# Altium PCB EEM_FMC_Carrier.PcbDoc (part 17 of 19)
Units mm, origin at the board's own origin, x right, y up, seen from the top; angles counter-clockwise.
Board outline 222.9 x 100 mm, 6 copper layers (TopLayer, MidLayer1, MidLayer2, SignalLayer1, Internal Plane 1, BottomLayer), stack 1.528 mm thick; 790 components, 743 nets, 3570 pads, 2277 vias.
Unrouted connection lines stored in the file: 3.
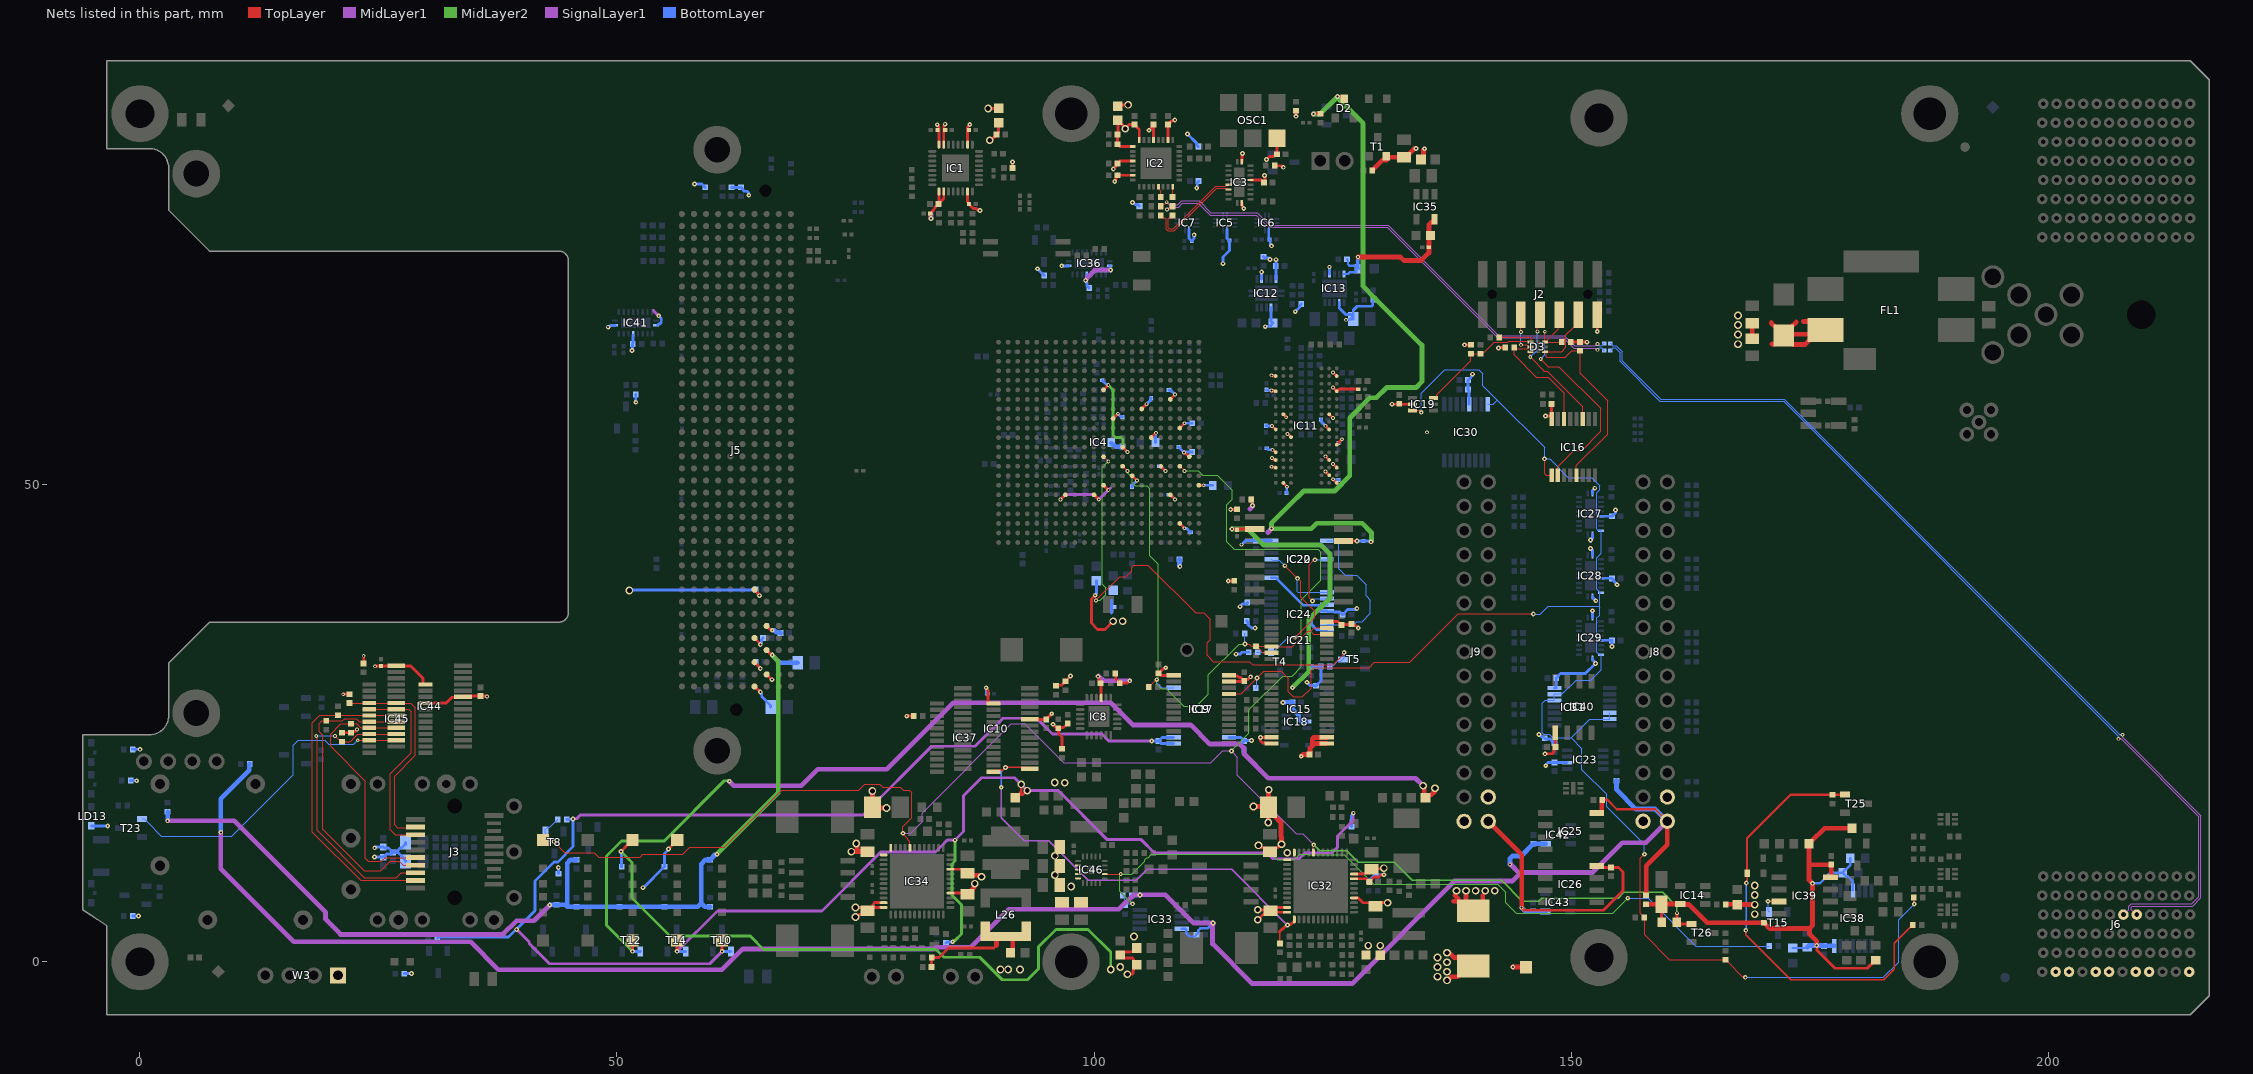
[diagram p19: the nets of this part, all layers, seen from the top]

## Via types
v1: diameter 0.4, hole 0.2, TopLayer to BottomLayer, tented both sides, 1032 vias
v2: diameter 0.5, hole 0.2, TopLayer to BottomLayer, tented both sides, 979 vias
v3: diameter 0.5, hole 0.2, TopLayer to BottomLayer, 162 vias
v4: diameter 0.8, hole 0.5, TopLayer to BottomLayer, tented both sides, 102 vias
v5: diameter 0.6, hole 0.3, TopLayer to BottomLayer, tented both sides, 2 vias

## Nets (pads, with @x,y where several pads share a name; then routed paths per layer and width w, separated by ;. In a path a pad name is that pad's centre, name@x,y a point inside that pad or via, vN(x,y) a via of type N, cw(c..) or ccw(c..) an arc to the next point about the centre after c; other vN are vias at no path point) (continued)
P1V5: C44.2 C80.2 C81.2 C82.2 C83.2 C84.2 C85.2 C86.2 C87.2 C91.2 C101.2 C135.2 C136.2 C137.2 C138.2 C139.2 C140.2 IC4.G19 IC4.H16 IC4.J13 IC4.K20 IC4.L17 IC4.N21 IC11.A1 IC11.A8 IC11.B2 IC11.C1 IC11.C9 IC11.D2 IC11.D9 IC11.E9 IC11.F1 IC11.G7 IC11.H2 IC11.H9 IC11.K2 IC11.K8 IC11.N1 IC11.N9 IC11.R1 IC11.R9 IC12.2 IC13.2 IC13.7 L22.2 R71.1 R74.2 T12.1 TP6.1 | length 150.6
  TopLayer w0.3: v2(51.625,1.1) TP6.1@51.625,2.25 ; IC4.J13@101.998,56.95 v1(102.498,57.45) ; IC4.H16@104.998,57.95 v1(105.498,58.45) ; IC4.L17@105.998,54.95 v1(106.498,55.45) ; IC4.G19@107.998,58.95 v1(108.498,59.45) ; IC4.K20@108.998,55.95 v1(109.498,56.45) ; v1(109.436,53.388) 109.455,53.369 109.525,53.369 109.944,52.95 IC4.N21@109.998,52.95 ; v1(118.591,59.887) 118.618,59.887 118.686,59.819 119.029,59.819 IC11.N9@119.048,59.8 ; v1(118.598,61.475) 118.625,61.475 118.693,61.407 119.041,61.407 IC11.R9@119.048,61.4 ; v1(118.618,51.892) 118.637,51.873 118.912,51.873 IC11.C9@118.985,51.8 ; v1(118.643,56.159) 118.666,56.159 119.025,55.8 IC11.H9@119.048,55.8 ; v1(118.669,52.807) 118.696,52.807 118.883,52.619 119.029,52.619 IC11.D9@119.048,52.6 ; v1(118.694,53.669) 118.721,53.669 118.822,53.569 118.852,53.569 119.021,53.4 IC11.E9@119.041,53.4 ; IC11.A8@119.848,50.2 119.848,50.175 v1(120.223,49.8) ; IC11.K8@119.848,57.4 119.848,57.388 120.146,57.09 v1(120.146,57.077) ; v1(120.294,55.325) 120.309,55.325 120.634,55 IC11.G7@120.648,55 ; v1(124.251,51.385) 124.263,51.385 IC11.B2@124.648,51 ; v1(124.251,56.185) 124.263,56.185 IC11.H2@124.648,55.8 ; v1(124.258,52.985) 124.26,52.985 IC11.D2@124.646,52.6 ; IC11.K2@124.648,57.4 v1(125.048,57) ; v1(125.051,50.585) 125.063,50.585 IC11.A1@125.448,50.2 ; v1(125.051,52.185) 125.063,52.185 IC11.C1@125.448,51.8 ; v1(125.051,60.185) 125.437,59.8 IC11.N1@125.448,59.8 ; v1(125.051,61.785) 125.437,61.4 IC11.R1@125.448,61.4 ; IC11.F1@125.448,54.2 125.448,54.225 v1(125.998,54.775) ; IC11.N1@125.448,59.8 125.674,60.025 C84.2@127.698,60.025
  TopLayer w0.5: v4@134.498,18.369 134.612,18.255 L22.2@134.612,17.45 ; L22.2@134.612,17.45 134.998,17.45 134.998,17.323 134.874,17.2 L22.2@134.748,17.2 ; L22.2@134.998,17.45 135.305,17.45 135.691,17.835 135.691,18.143 v4(135.748,18.2)
  MidLayer2 w0.3: v2(51.625,1.1) 48.9,3.825 48.9,11.1 50.475,12.675 54.95,12.675 61.25,18.975 61.725,18.975 61.773,18.927 v2(61.778,18.927)
  SignalLayer1 w0.5: v2(61.778,18.927) 62.254,18.45 69.323,18.45 71.048,20.175 78.273,20.175 85.248,27.15 101.738,27.15 104.063,24.825 110.133,24.825 112.133,22.825 114.808,22.825 114.809,22.826 115.297,22.826 115.723,22.4 115.723,21.8 118.273,19.25 133.698,19.25 v4(134.498,18.45)
  BottomLayer w0.3: v2(51.625,1.1) T12.1@52.45,1.1 ; v1(102.498,57.45) 102.773,57.175 102.948,57.175 102.998,57.125 C138.2@102.998,57.1 ; v1(105.498,58.45) 105.948,58.9 105.948,59.05 C139.2@105.998,59.1 ; C101.2@106.448,54.45 106.448,55.373 v1@106.498,55.423 ; C137.2@107.848,59.95 107.898,59.9 108.048,59.9 v1(108.498,59.45) ; C140.2@108.848,53.95 108.873,53.95 109.435,53.388 v1(109.436,53.388) ; v1@109.498,53.45 C136.2@110.298,53.45 ; v1(109.498,56.45) C135.2@110.298,56.45 ; v2(117.948,66.575) 118.002,66.575 118.052,66.625 118.423,66.625 C91.2@118.748,66.95 118.57,67.128 IC12.2@118.57,68.573 ; C81.2@118.023,56.2 118.044,56.179 118.624,56.179 v1(118.643,56.159) ; C80.2@118.073,59.95 118.117,59.906 118.572,59.906 v1(118.591,59.887) ; C86.2@118.098,53.825 118.123,53.825 118.279,53.669 v1@118.667,53.669 ; C82.2@120.173,49.125 120.204,49.156 120.204,49.781 v1(120.223,49.8) ; v2(121.098,68.15) 121.578,68.63 121.578,68.81 R71.1@121.718,68.95 ; C87.2@123.798,56.85 123.823,56.85 123.873,56.8 123.873,56.564 v1(124.251,56.185) ; IC13.7@124.7,72.094 v1(124.7,72.819) ; v1@125.078,50.585 125.141,50.523 125.6,50.523 C83.2@125.623,50.5 ; C85.2@125.623,54.375 125.623,54.4 125.673,54.45 125.698,54.45 125.998,54.75 v1(125.998,54.775) ; IC13.2@125.7,69.094 125.7,68.544 126.375,67.869 C44.2@127.125,67.869 ; v1(126.4,67.294) 126.85,67.294 C44.2@127.175,67.619 ; C44.2@127.175,67.394 127.175,68.294 127.6,68.719 129.1,68.719 129.225,68.844 129.225,69.349 R74.2@129.27,69.394
P1V8: C173.2 L3.1 L5.1 L28.2 R200.2 R228.2 T14.1 TP8.1 | length 115.1
  TopLayer w0.3: v2(56.3,1.1) 56.3,2.238 TP8.1@56.312,2.25 ; L28.2@91.698,17.25 L28.2@91.748,17.2 L28.2@92.098,17.55 ; v4@92.371,18.774 92.371,17.823 L28.2@92.098,17.55 ; v4(92.998,17.95) 92.972,17.95 92.572,17.55 L28.2@92.098,17.55 ; v2(100.123,38.425) 99.723,38.025 99.723,35.5 100.373,34.85 101.148,34.85 v4(101.998,35.7)
  MidLayer2 w0.3: v2(85.198,2.104) 85.252,2.104 85.352,2.204 85.402,2.204 86.123,2.925 86.123,5.975 85.123,6.975 85.123,10.25 85.425,10.552 v2(85.425,12.754)
  SignalLayer1 w0.3: v2(56.3,1.1) 60.525,5.325 71.473,5.325 77.648,11.5 83.373,11.5 83.948,12.075 83.948,12.077 84.625,12.754 v2(85.425,12.754) 86.323,13.652 86.323,17.4 88.223,19.3 91.67,19.3 v4(92.371,18.599) v4@93.009,17.961 ; v4(92.998,17.95) 96.248,17.95 101.395,12.803 104.947,12.803 106.35,11.4 118.2,11.4 118.793,10.807 121.082,10.807 121.101,10.826 121.526,10.826 122.1,11.4 124.925,11.4 125.525,12 125.525,13.175 127.179,14.829 v2(127.179,15.581)
  BottomLayer w0.3: v2(56.3,1.1) T14.1@57.2,1.1 ; R228.2@84.498,1.98 84.584,2.066 85.16,2.066 v2(85.198,2.104) ; v2(100.123,38.425) 100.123,38.479 100.248,38.604 L3.1@100.248,39.95 ; 101.848,36.55 101.848,37.9 ; R200.2@126.998,14.17 126.998,15.346 127.179,15.527 v2(127.179,15.581)
  other v4: 102.998,35.7
P2V5: C67.2 C74.2 C76.2 C102.2 C153.2 C175.2 C177.2 C178.2 C182.2 C183.2 C185.2 C187.2 C189.2 C190.2 C191.2 C251.2 C257.2 C288.2 C289.2 D2.3 IC4.F12 IC4.M14 IC4.P18 IC4.R15 IC4.T12 IC4.T22 IC4.U8 IC4.U11 IC4.U19 IC4.Y20 IC8.21 IC9.1 IC17.1 IC17.2 IC20.14 IC21.14 IC22.14 IC23.2 IC24.12 IC24.15 IC32.8 L20.2 R28.2 R29.2 R34.2 R35.2 R78.2 R81.2 R82.2 R98.2 R99.2 R100.2 R102.2 R103.2 R106.2 R108.2 R112.2 R113.2 R208.2 R213.2 T10.1 TP4.1 | length 275
  TopLayer w0.3: TP4.1@61,2.25 61.025,2.225 v2(61.025,1.1) ; v1(96.498,48.45) IC4.U8@96.998,48.95 ; IC4.U11@99.998,48.95 v1(100.498,48.45) ; v2(100.423,29.925) 100.423,29.871 100.538,29.756 100.538,29.36 C74.2@100.698,29.2 C74.2@100.748,29.15 ; IC8.21@100.748,27.65 C74.2@100.748,29.15 ; C74.2@100.758,29.14 C74.2@100.748,29.15 ; IC4.T12@100.998,49.95 v1(101.498,49.45) ; IC4.F12@100.998,59.95 v1(101.498,60.45) ; R29.2@102.218,30.2 102.286,30.132 102.286,29.632 102.558,29.36 102.578,29.36 102.718,29.22 R28.2@102.718,29.2 103.472,29.2 103.722,29.45 v2(103.748,29.45) ; IC4.M14@102.998,53.95 v1(103.498,53.45) ; IC4.R15@103.998,50.95 v1(104.498,50.45) ; IC4.P18@106.998,51.95 107.496,51.452 v1(107.502,51.452) ; v2(107.523,30.825) 107.485,30.787 107.343,30.787 107.157,30.601 107.099,30.601 C76.2@106.748,30.25 106.973,30.025 IC9.1@108.348,30.025 ; IC4.U19@107.998,48.95 v1(108.498,48.45) ; IC4.Y20@108.998,45.95 v1(109.498,45.45) ; IC4.T22@110.998,49.95 v1(111.498,49.95) ; v2(114.073,39.925) 114.076,39.923 114.696,39.923 R100.2@114.698,39.92 ; v2(114.328,47.42) R99.2@114.998,47.42 ; R35.2@116.468,48.45 116.573,48.345 116.573,47.863 v2(116.611,47.825) ; v2(122.998,88.875) 123.013,88.89 R34.2@123.748,88.89 ; IC21.14@124.408,35.66 125.568,35.66 125.765,35.463 125.765,35.443 125.838,35.37 127.028,35.37 127.158,35.24 127.424,35.24 v2@127.664,35 ; v2(125.523,90.7) 126.148,90.7 D2.3@126.248,90.6 ; IC22.14@126.148,44.105 v2(127.568,44.105) ; IC32.8@127.248,8.7 128.548,8.7 128.548,8.675 C257.2@128.823,8.4 ; C257.2@128.948,8.525 128.99,8.525 129.364,8.899 129.885,8.899 130.073,9.087 130.36,9.087 v2(130.398,9.125)
  TopLayer w0.5: C251.2@128.523,0.675 C251.2@128.548,0.7 ; L20.2@129.967,0.669 L20.2@129.998,0.7
  MidLayer1 w0.3: v1(96.498,48.45) 97.023,48.975 99.973,48.975 v1(100.498,48.45) v1(101.498,49.45) 101.727,49.679
  MidLayer1 w0.5: 116.348,47.45 116.611,47.713 v2(116.611,47.825) ; 118.25,45 118.25,45.052 v2(118.598,45.4)
  MidLayer2 w0.3: v1(101.498,60.45) 101.998,59.95 101.998,55.202 102.256,54.944 102.881,54.944 103.025,54.8 ; 103.023,54.8 103.023,53.925 v1(103.498,53.45)
  MidLayer2 w0.5: v2(122.998,88.875) 123.698,88.875 v2(125.523,90.7) 125.523,90.575 128.197,87.901 128.197,77.75 128.197,70.828 129.448,69.577 134.373,64.652 134.373,60.814 133.759,60.2 130.675,60.2 129.6,59.125 128.923,59.125 126.8,57.002 126.8,50.925 125.225,49.35 121.975,49.35 120.475,47.85 118.598,45.973 v2(118.598,45.4) 122.773,45.4 123.349,45.976 128.099,45.976 129.075,45 129.075,44.075 v2(129.025,44.025)
  SignalLayer1 w0.3: v2(39.484,3.391) 40.8,2.075 40.8,1.927 42.927,-0.2 59.725,-0.2 v2(61.025,1.1) ; v2(45.387,14.977) 45.411,15 45.775,15 46.15,15.375 75.773,15.375 82.986,22.588 87.514,22.588 90.45,25.525 93.998,25.525 95.648,23.875 100.823,23.875 101.548,23.15 v2(106.048,23.15)
  SignalLayer1 w0.5: v2@100.498,29.95 100.998,29.45 v2(103.748,29.45)
  BottomLayer w0.3: R78.2@31.17,2.475 31.295,2.6 38.639,2.6 39.43,3.391 v2(39.484,3.391) 39.484,3.445 41.4,5.361 41.4,8.475 43.4,10.475 43.8,10.475 45.4,12.075 45.4,14.964 v2(45.387,14.977) 45.362,14.951 44.771,14.951 R213.2@44.745,14.925 ; v2(61.025,1.1) T10.1@61.95,1.1 ; C102.2@100.873,60.95 100.923,60.9 100.923,60.875 101.298,60.5 101.421,60.5 101.471,60.45 v1(101.498,60.45) ; C178.2@102.998,54 103.158,53.84 103.158,53.79 v1(103.498,53.45) ; C288.2@103.998,49.8 104.048,49.85 104.048,50 v1(104.498,50.45) ; v2(106.048,23.15) C67.2@106.748,23.15 ; C183.2@106.848,51.95 106.898,51.9 107.048,51.9 107.496,51.452 v1(107.502,51.452) ; C289.2@107.848,48.95 107.898,48.9 108.048,48.9 v1(108.498,48.45) ; IC17.1@108.348,22.875 107.023,22.875 C67.2@106.748,23.15 ; IC17.2@108.348,23.525 107.123,23.525 C67.2@106.748,23.15 ; v1(109.498,45.45) 109.517,45.431 109.717,45.431 110.123,45.025 C182.2@110.148,45.025 ; v1(111.498,49.95) C175.2@112.448,49.95 ; v2(114.875,32.25) 115.325,32.25 115.525,32.45 R113.2@116.23,32.45 ; v2(115.302,37.228) 115.302,37.252 115.586,37.535 115.968,37.535 R106.2@116.108,37.675 ; v1(115.473,43.725) 115.898,44.15 C191.2@116.998,44.15 IC20.14@118.598,44.15 ; R112.2@116.005,35.725 116.145,35.585 116.145,35.329 116.498,34.976 116.888,34.976 v2(116.895,34.983) ; v2(122.323,29.3) 122.664,28.959 123.209,28.959 R81.2@123.248,28.92 123.268,28.92 123.408,29.06 123.408,29.08 123.778,29.45 R82.2@123.778,30.95 ; R108.2@122.748,30.92 R82.2@123.748,30.92 ; IC24.15@124.436,34.825 123.325,34.825 122.825,35.325 122.825,36.15 123.444,36.769 124.43,36.769 IC24.12@124.436,36.775 124.511,36.7 125.149,36.7 125.199,36.65 125.8,36.65 C190.2@125.975,36.475 ; C190.2@126.075,36.375 126.426,36.726 126.426,36.784 126.566,36.924 127.395,36.924 127.496,37.025 v2(127.55,37.025) ; v2@127.573,44.1 C189.2@128.248,44.1 128.896,44.1 128.971,44.025 v2(129.025,44.025) ; R208.2@128.778,8.45 128.778,8.47 128.918,8.61 128.938,8.61 129.453,9.125 v2(130.398,9.125) ; v2(146.641,23.82) 146.665,23.82 146.926,23.56 147.108,23.56 147.316,23.352 147.816,23.352 148.088,23.08 148.088,23.06 148.228,22.92 R103.2@148.248,22.92 ; v2(147.35,20.55) 147.388,20.588 147.388,20.67 147.618,20.9 149.573,20.9 IC23.2@149.598,20.875
  BottomLayer w0.45: C153.2@101.798,54.375 101.973,54.2 102.078,54.2 102.274,54.004 102.994,54.004 C178.2@102.998,54
  BottomLayer w0.5: C177.2@108.948,42.2 108.948,41.5 v2(108.998,41.45)
  other v2: 127.7,35
  other v4: 128.748,1.7 129.998,1.7
P3V3: C8.1 C31.2 C39.2 C42.2 C46.2 C47.2 C48.2 C66.2 C75.2 C77.2 C88.2 C111.2 C114.2 C179.2 C180.2 C181.2 C184.2 C188.2 C192.2 C203.2 C221.2 C222.2 C223.2 C224.2 C225.2 C226.2 C278.2 C279.2 C287.2 C298.2 C299.1 C300.2 C323.2 IC3.1 IC3.6 IC3.10 IC5.6 IC6.6 IC7.6 IC9.23 IC9.24 IC10.9 IC12.7 IC12.10 IC15.1 IC15.2 IC15.23 IC15.24 IC16.16 IC17.23 IC17.24 IC18.5 IC19.5 IC22.2 IC27.1 IC27.6 IC27.10 IC28.1 IC28.6 IC28.10 IC29.1 IC29.6 IC29.10 IC30.13 IC31.1 IC36.1 IC36.6 IC36.10 IC37.24 IC40.14 IC41.1 IC41.6 IC41.10 IC44.9 IC44.15 IC45.21 IC45.24 J2.2 J5.d32 L1.1 L2.2 L6.2 L7.2 L26.2 LD13.2 OSC1.6 R18.2 R19.2 R22.2 R30.2 R31.2 R32.2 R33.2 R37.2 R44.2 R70.2 R76.2 R85.2 R86.2 R87.2 R92.2 R121.2 R122.2 R123.2 R178.2 R179.2 R180.2 R207.2 R225.2 R226.2 R230.2 R251.2 R256.2 R278.2 R288.2 TP3.1 W3.1 | length 196.9
  TopLayer w0.3: R180.2@21.175,24.02 21.19,24.005 R278.2@22.125,24.005 22.265,24.145 22.524,24.145 22.729,24.35 v1(22.75,24.35) ; v1(21.3,28.05) 21.327,28.05 21.347,28.07 R179.2@21.975,28.07 ; R288.2@23.425,31.27 23.45,31.295 v1(23.45,32.075) ; v1(24.625,30.975) 24.652,30.975 24.677,31 C114.2@25.275,31 25.3,31.025 IC44.15@26.853,31.025 28.346,31.025 29.651,29.72 29.651,29.15 29.726,29.075 IC45.24@29.925,29.075 ; IC45.21@29.925,27.125 32.1,27.125 32.708,27.733 33.811,27.733 IC44.9@33.853,27.775 33.927,27.85 C323.2@35.7,27.85 35.705,27.845 36.328,27.845 36.348,27.825 v1(36.375,27.825) ; v2(55.39,11.822) 55.39,11.827 TP3.1@56.312,12.75 ; J5.d32@64.418,39.019 64.418,39.005 64.913,38.51 64.913,38.415 v2(64.951,38.377) ; v2(80.375,25.75) 80.388,25.763 81.118,25.763 R37.2@81.13,25.775 ; C279.2@82.948,-0.55 82.948,0.43 R230.2@82.968,0.45 83.748,0.45 84.748,1.45 89.498,1.45 ; v2(88.7,28.725) 88.7,28.671 88.875,28.496 88.875,27.15 88.95,27.075 IC37.24@89.45,27.075 IC37.24@89.4,27.125 ; v4(88.898,89.45) L2.2@89.998,89.45 ; C8.1@91.448,83.2 v2(91.448,83.85) ; IC10.9@93.248,25.425 93.273,25.4 C77.2@94.998,25.4 95.158,25.56 95.158,25.585 v2(95.573,26) ; v2@95.692,24.896 95.968,24.62 96.088,24.62 R33.2@96.088,24.34 ; R31.2@96.023,28.92 96.091,28.988 96.591,28.988 96.863,29.26 96.863,29.28 97.003,29.42 R30.2@97.023,29.42 97.043,29.42 97.183,29.56 97.183,29.58 97.523,29.92 v2(97.523,29.95) ; R19.2@96.65,22.325 96.65,23.55 96.284,23.916 96.284,24.444 R33.2@96.248,24.48 96.316,24.548 96.816,24.548 97.088,24.82 97.088,24.84 97.228,24.98 R32.2@97.248,24.98 ; L1.1@102.498,89.7 102.623,89.825 v4(103.575,89.825) ; IC9.23@114.148,29.375 115.373,29.375 C75.2@115.599,29.601 ; IC9.24@114.148,30.025 114.221,29.952 115.048,29.952 115.199,29.801 115.399,29.801 C75.2@115.599,29.601 ; v2(114.448,45.375) IC22.2@116.848,45.375 ; IC3.1@115.498,79.55 115.498,79.229 115.698,79.029 v2(115.698,78.975) ; IC3.10@115.498,83.85 115.498,84.589 115.577,84.667 v2(115.577,84.721) ; IC3.6@116.398,81.95 117.548,81.95 C39.2@117.798,81.7 117.938,81.84 117.938,82.302 117.876,82.364 v2(117.876,82.418) ; v2(116.425,29.875) 116.414,29.875 116.149,29.61 115.608,29.61 C75.2@115.599,29.601 ; v2(118.089,84.104) 118.412,84.426 118.837,84.426 118.901,84.49 119.013,84.49 C31.2@119.173,84.65 119.188,84.665 OSC1.6@119.188,86.325 ; IC15.24@118.598,22.875 118.523,22.95 117.673,22.95 117.468,23.155 117.468,23.505 v2(117.448,23.525) IC15.23@118.598,23.525 ; R22.2@118.943,83.45 119.619,83.45 119.794,83.275 v2(119.848,83.275) ; v2(121.173,88.625) R256.2@121.173,89.205 ; v2(131.248,58.45) IC19.5@133.398,58.45 ; v2(138.843,64.67) R92.2@139.498,64.67 ; v2(142.398,64.35) 142.398,64.33 142.328,64.4 R87.2@143.103,64.4 ; v2(147.275,21.8) 147.284,21.809 148.042,21.809 148.226,21.993 148.226,22.383 148.343,22.5 IC31.1@148.343,24 ; v2(147.323,57.225) 147.948,57.225 147.948,56.925 IC16.16@147.973,56.9 ; IC16.16@147.948,57.347 C180.2@147.948,58.45 ; R86.2@149.968,64.95 v2(151.673,64.95) ; v2(152.748,66.075) J2.2@152.748,67.825
  TopLayer w0.5: 89.748,1.7 89.791,1.743 89.791,2.45 90.016,2.675 L26.2@90.748,2.675 91.248,2.675 91.473,2.45 91.473,1.175 C278.2@91.248,0.95 ; v2(121.723,21.55) 121.898,21.725 C179.2@122.598,21.725 122.638,21.765 122.638,22.365 122.875,22.602 ; IC15.1@124.398,22.875 123.148,22.875 122.875,22.602 ; IC15.2@124.398,23.525 123.012,23.525 122.875,23.388 122.875,22.602
  MidLayer1 w0.3: 53.85,68.3 53.85,68.235 v2(54.376,67.709)
  MidLayer2 w0.5: v2(114.448,45.375) 116.073,45.375 117.748,43.7 123.748,43.7 124.748,42.7 124.748,38.135 122.498,35.885 122.498,30.423 v2(120.8,28.725)
  SignalLayer1 w0.5: v2(99.123,71.425) 99.247,71.549 99.247,71.639 100.133,72.525 v2(101.748,72.525)
  BottomLayer w0.3: LD13.2@-5.1,14.25 v2(-3.375,14.25) ; R226.2@-0.98,19 -0.968,18.988 -0.363,18.988 v2(-0.35,18.975) ; R44.2@-0.78,22.275 v2(0,22.275) ; R178.2@-0.757,4.8 v2(-0.15,4.8) ; v2(24.575,11) 24.595,10.98 25.48,10.98 C192.2@25.5,10.96 25.505,10.96 25.835,11.29 26.34,11.29 C299.1@26.5,11.45 ; v2(24.6,11.95) 24.654,11.95 24.744,12.04 C42.2@25.5,12.04 25.627,11.913 26.037,11.913 C299.1@26.5,11.45 ; R76.2@27.72,-1.25 27.732,-1.237 28.437,-1.237 v2(28.45,-1.225) ; L6.2@27.85,10.5 27.85,10.65 27.05,11.45 C299.1@26.5,11.45 ; L7.2@27.85,12.5 27.85,12.35 27.425,11.925 27.275,11.925 26.96,11.61 26.66,11.61 C299.1@26.5,11.45 ; v2(43.85,9.9) R207.2@43.85,9.245 R207.2@43.865,9.26 ; v2(49.075,66.525) 49.129,66.525 49.304,66.7 49.775,66.7 IC41.10@49.8,66.725 ; v4(51.298,38.925) 51.348,38.975 64.498,38.975 C203.2@64.548,39.025 64.708,38.865 64.708,38.675 64.958,38.425 v2@64.993,38.425 ; v2(51.575,64.075) 51.613,64.113 51.613,64.738 C300.2@51.65,64.775 51.675,64.8 51.675,65.41 IC41.6@51.675,65.675 ; R18.2@51.945,59.475 51.96,59.46 51.96,58.665 v2(51.975,58.65) ; v2(52.725,7.775) 52.763,7.813 52.823,7.813 54.985,9.975 R225.2@54.985,9.985 ; IC41.1@54.25,66.75 54.361,66.861 54.499,66.861 54.639,67.001 54.639,67.449 v2@54.499,67.589 ; R225.2@55,9.97 R225.2@54.985,9.985 ; v2(55.39,11.822) 55.39,11.768 54.985,11.363 R225.2@54.985,9.985 ; v2(58.123,81.525) 58.898,81.525 59.088,81.335 59.088,81.315 59.228,81.175 R121.2@59.248,81.175 ; R122.2@61.998,81.175 R123.2@62.998,81.175 63.018,81.175 63.147,81.046 63.158,81.035 63.158,80.94 63.334,80.764 63.616,80.764 63.704,80.676 63.774,80.606 ccw(c65.713,80.853) v2(63.822,80.355) ; v2(88.7,28.725) 88.7,28.671 88.75,28.621 88.75,28.15 88.8,28.1 C111.2@88.825,28.1 ; v2(94.073,72.65) 94.613,72.11 94.638,72.11 94.778,71.97 R251.2@94.778,71.95 ; v2(96.623,72.95) IC36.10@97.348,72.95 ; IC36.6@99.248,72.05 99.248,71.604 99.123,71.479 v2(99.123,71.425) 99.161,71.387 99.161,71.245 99.248,71.159 99.248,70.9 C287.2@99.498,70.65 ; IC36.1@101.648,72.95 101.685,72.95 101.71,72.925 101.71,72.563 v2(101.748,72.525) ; IC7.6@109.948,76.75 109.948,75.85 110.173,75.625 110.198,75.625 C48.2@110.248,75.575 ; C48.2@110.248,75.55 C48.2@110.248,75.575 ; v2(110.498,76.2) 110.498,75.801 110.322,75.625 110.298,75.625 C48.2@110.248,75.575 ; v2(113.513,73.177) 113.513,73.889 114.198,74.574 C46.2@114.198,75.6 114.173,75.6 113.948,75.825 IC5.6@113.948,76.75 ; IC17.24@114.148,22.875 115.412,22.875 115.527,22.99 115.588,22.99 C66.2@115.748,23.15 ; IC17.23@114.148,23.525 115.412,23.525 115.588,23.349 115.588,23.31 115.698,23.2 v2(116.498,23.2) ; IC12.7@117.57,71.573 117.57,72.297 v2(117.573,72.3) ; R70.2@117.748,73.92 117.864,73.804 118.257,73.804 v2(118.446,73.615) ; IC6.6@118.323,76.75 118.323,75.75 118.373,75.7 C47.2@118.398,75.7 118.423,75.7 118.473,75.65 118.473,75.229 118.598,75.104 v2(118.598,75.05) ; IC12.10@119.07,71.573 119.07,72.928 C88.2@119.048,72.95 119.06,72.963 119.06,73.587 v2(119.073,73.6) ; IC30.13@139.323,58.45 139.323,59.875 C221.2@139.198,60 C222.2@139.198,61 139.358,61.16 139.397,61.16 139.635,61.397 139.635,61.562 v2(139.673,61.6) ; IC40.14@148.254,28.696 148.375,28.696 148.45,28.771 C298.2@148.45,29.75 ; C298.2@148.45,29.755 148.455,29.755 148.61,29.91 148.61,29.915 148.902,30.208 151.496,30.208 v2(152.556,31.267) 152.518,31.306 152.518,31.405 152.248,31.675 IC29.10@152.248,31.8 ; v2@152.059,43.35 v2(152.034,43.325) 152.073,43.325 152.248,43.15 IC28.1@152.248,42.6 ; v2@152.072,44.051 152.072,44.163 v2(152.034,44.202) 152.072,44.202 152.248,44.377 IC27.10@152.248,44.8 ; IC29.1@152.248,36.1 v2(152.248,36.8) ; IC28.10@152.248,38.3 152.248,38.175 152.298,38.125 152.322,38.125 v2@152.597,37.85 ; IC27.1@152.248,49.1 152.248,49.4 v2(152.498,49.65) ; IC29.6@153.148,33.7 C225.2@154.298,33.7 v2(154.298,33.05) ; IC28.6@153.148,40.2 C223.2@154.298,40.2 154.458,40.04 154.458,39.94 154.826,39.572 v2(154.826,39.525) v2@154.873,39.478 ; IC27.6@153.148,46.7 C224.2@154.298,46.7 154.649,47.051 154.649,47.109 154.673,47.133 v2(154.673,47.35)
  BottomLayer w0.5: v2(119.8,27.175) 119.825,27.2 C181.2@120.798,27.2 120.801,27.197 120.801,26.522 121.473,25.85 121.473,25.443 121.761,25.155 122.243,25.155 IC18.5@122.248,25.15
  other v1: 134.9,55.5
  other v2: 95.692,24.897 152.598,37.85
  other v4: 90.19,-0.8 90.998,-0.8 92.248,-0.8 96.925,18.775 95.875,18.8
P3V3_ADCLK: C32.2 C33.2 C34.2 C35.2 C36.2 C37.2 C38.2 IC1.10 IC1.15 IC1.16 IC1.25 IC1.26 IC1.31 L2.1 | length 16.9
  TopLayer w0.3: v2(82.923,77.9) 82.886,77.938 82.886,78.413 C35.2@82.848,78.45 82.873,78.45 82.923,78.5 82.923,78.525 83.173,78.775 83.173,78.867 83.347,79.041 83.347,79.099 C38.2@83.698,79.45 C38.2@83.748,79.5 ; v2(83.573,87.75) 83.573,87.696 83.748,87.521 IC1.16@83.748,85.65 ; IC1.25@83.748,80.75 C38.2@83.748,79.5 ; IC1.26@84.248,80.75 84.248,80 C38.2@83.748,79.5 ; IC1.15@84.248,85.65 84.248,87.596 84.398,87.746 v2(84.398,87.8) ; IC1.31@86.748,80.75 86.748,79.676 86.823,79.601 86.823,79.5 86.873,79.45 86.923,79.45 86.973,79.4 86.973,79.312 87.336,78.949 87.657,78.949 87.818,78.788 88.01,78.788 v2(88.048,78.75) ; IC1.10@86.748,85.65 86.748,87.499 86.973,87.724 v2(86.973,87.775) ; v4(89.073,86.125) 89.169,86.221 89.319,86.221 C32.2@89.798,86.7 89.998,86.9 L2.1@89.998,87.95
  SignalLayer1 w0.5: v2(82.923,77.9) 82.923,78.324
P3V3_CLK_MUX: C10.1 C16.1 C21.1 C22.2 C23.2 C24.2 C25.2 C26.2 C27.2 C28.2 IC2.10 IC2.13 IC2.16 IC2.17 IC2.20 IC2.23 L1.2 | length 21.5
  TopLayer w0.3: v2(102.026,83.095) 102.026,83.109 102.288,83.371 102.288,83.54 C28.2@102.448,83.7 102.698,83.95 IC2.20@104.048,83.95 ; v2(102.173,81.8) 102.173,81.854 102.288,81.969 102.288,82.29 C24.2@102.448,82.45 IC2.23@104.048,82.45 ; IC2.17@104.048,85.45 102.698,85.45 C23.2@102.448,85.7 C25.2@102.448,86.7 102.498,86.75 L1.2@102.498,88.2 103.273,87.425 v4(103.273,87.325) 103.698,87.75 C26.2@104.248,87.75 104.748,87.25 IC2.16@104.748,86.15 ; v2(105.756,87.164) 105.756,87.183 106.088,87.515 106.088,87.59 C27.2@106.248,87.75 IC2.13@106.248,86.15 ; IC2.10@107.748,86.15 C22.2@107.748,87.75 108.099,88.101 108.157,88.101 108.243,88.187 108.435,88.187 v2(108.473,88.225)
  BottomLayer w0.3: v2(104.048,79.6) 104.102,79.6 104.317,79.385 104.588,79.385 C21.1@104.748,79.225 ; v2(109.798,86.775) 110.763,85.81 110.763,85.635 C16.1@110.923,85.475 ; v2(110.773,81.125) 110.773,81.179 110.824,81.23 110.824,81.676 C10.1@110.973,81.825
P3V3_FMC: C207.2 C208.1 C209.1 C230.2 J5.c39 J5.d36 J5.d38 J5.d40 L9.2 L11.2 R160.2 TP9.1 | length 81.4
  TopLayer w0.3: v2(50.425,11.576) 51.114,12.265 51.14,12.265 51.599,12.724 TP9.1@51.599,12.75 ; J5.d38@64.418,31.399 65.023,30.794 v2(65.023,30.75) ; J5.d36@64.418,33.939 64.985,33.372 64.985,33.296 v2(65.023,33.257) ; J5.d40@64.439,28.859 v2(65.023,28.275) ; J5.c39@65.688,30.129 66.242,29.575 v2(66.248,29.575) ; 103.998,-1.3 104.098,-1.2 104.098,-0.95 104.148,-0.9 104.148,-0.65 L11.2@104.498,-0.3 104.148,0.05 104.148,0.3 104.041,0.407 103.041,0.407 C230.2@102.748,0.7 103.073,1.025 103.724,1.025 103.749,1.05 104.023,1.05 104.073,1.1 104.148,1.1 L9.2@104.498,1.45
  MidLayer2 w0.3: v2(50.425,11.576) 51.575,10.426 51.575,6.675 55.55,2.7 63.973,2.7 65.373,1.3 83.448,1.3 84.272,0.476 88.029,0.476 90.38,-1.875 93.025,-1.875 94.2,-0.7 94.2,1.6 96,3.4 99.375,3.4 101.748,1.027 v4(101.748,-0.8)
  BottomLayer w0.3: v2(50.425,11.576) 50.463,11.538 50.463,10.007 R160.2@50.5,9.97 ; C207.2@64.548,31.45 64.708,31.29 64.708,31.119 v2@65.023,30.804 ; v2(65.023,28.275) 65.023,28.221 65.175,28.069 65.175,27.798 66.098,26.875 C208.1@66.098,26.7 ; v2(65.023,33.257) 65.023,33.312 65.138,33.427 65.138,33.79 C209.1@65.298,33.95
  other v4: 103.498,-1.3 102.748,-0.55 104.198,2.65
P3V3_FMC_ENABLE: IC10.1 IC32.37 IC37.13 R191.2 | length 48.6
  TopLayer w0.15: IC37.13@89.45,19.925 89.597,20.072 90.422,20.072 v2(90.725,20.375) 93.098,20.375 IC10.1@93.248,20.225 ; 119.459,3.12 119.459,1.959 R191.2@119.498,1.92
  TopLayer w0.3: 119.462,3.122 119.462,3.168 119.734,3.44 119.779,3.44 120.089,3.75 120.121,3.75 120.259,3.888 120.588,3.888 120.875,4.175 120.998,4.175 IC32.37@120.998,4.45
  SignalLayer1 w0.15: v2(90.273,18.296) 90.273,15.1 92.687,12.686 95.264,12.686 99.4,8.55 104.45,8.55 105.6,9.7 114.425,9.7 v2(120.275,3.85)
  BottomLayer w0.15: v2(90.273,18.296) 90.273,19.923 v2(90.725,20.375)
P3V3_MP: C219.2 C245.2 C306.2 IC25.8 IC33.8 IC42.4 J8.30 R101.2 R186.2 R187.2 R283.2 | length 221.6
  TopLayer w0.25: IC25.8@152.698,15.605 152.793,15.7 IC25.8@153.053,15.7 ; IC25.8@152.793,15.605 IC25.8@153.003,15.605 ; C219.2@153.275,16.944 153.317,16.986 153.814,16.986 154.8,16 158.825,16 J8.30@160.098,14.727
  TopLayer w0.5: IC25.8@153.003,15.605 153.165,15.605 153.215,15.655 153.215,16.884 C219.2@153.275,16.944 ; R283.2@157.875,6.97 157.875,10.05 160.098,12.273 J8.30@160.098,14.727
  SignalLayer1 w0.5: v2(8.475,13.575) 8.475,9.75 16.125,2.1 34.65,2.1 37.575,-0.825 61,-0.825 63.175,1.35 83.3,1.35 83.478,1.528 87.103,1.528 91.075,5.5 102.609,5.5 104.112,7.003 v2(104.815,7.003) ; v2@104.832,7.02 107.48,7.02 110.439,4.061 v2(112.459,4.061) 112.459,3.901 112.422,3.864 112.422,1.878 116.575,-2.275 127.05,-2.275 137.8,8.475 143.875,8.475 144.644,9.244 ; v1(143.625,10.2) 143.688,10.2 144.644,9.244 ; J8.30@160.098,14.727 157.846,12.475 155.375,12.475 152.276,9.376 144.776,9.376 144.644,9.244
  BottomLayer w0.25: R187.2@103.968,6.93 104.675,6.93 104.747,7.003 v2(104.815,7.003) ; IC33.8@109.198,3.475 109.552,3.475 109.652,3.375 109.652,3.021 110.023,2.65 C245.2@110.548,2.65 ; C245.2@110.733,2.835 110.918,3.02 110.918,3.268 111.152,3.502 111.9,3.502 v2(112.459,4.061)
  BottomLayer w0.5: v2(8.475,13.575) 8.475,17.1 11.46,20.085 11.46,20.71 R186.2@11.5,20.75 ; v1(143.625,10.2) 143.613,10.212 143.613,10.846 143.85,11.083 144.758,11.083 C306.2@146.05,12.375 IC42.4@147.35,12.375 ; R101.2@154.773,19.02 154.773,18.027 156.783,16.017 158.808,16.017 J8.30@160.098,14.727
P3V3_MP2: C220.2 C307.2 IC26.8 IC43.4 J9.30 | length 29.6
  TopLayer w0.3: v1(144.825,5.675) 145.1,5.4 153.4,5.4 155.45,7.45 155.45,9.425 154.975,9.9 IC26.8@152.743,9.9
  TopLayer w0.5: J9.30@141.314,14.714 144.825,11.203 v1(144.825,5.675)
  BottomLayer w0.5: v1(144.825,5.675) 145.2,5.3 C307.2@146.025,5.3 147.3,5.3 IC43.4@147.325,5.275
P3V3_MP_B: C43.1 C155.2 C167.2 IC14.5 IC38.4 IC38.14 IC39.8 R197.1 R260.1 R262.1 R266.1 R267.2 R268.1 R277.2 R279.1 R282.1 R283.1 | length 60.5
  TopLayer w0.3: R277.2@159.5,4.125 159.5,6.028 C43.1@159.524,6.052 ; v2(175.75,1.7) 175.788,1.662 175.788,1.212 177.675,-0.675 181.055,-0.675 181.886,0.155 R279.1@181.936,0.155
  TopLayer w0.5: R283.1@157.875,6.03 C43.1@159.502,6.03 ; C43.1@159.524,6.052 IC14.5@161.448,6.052 ; IC14.5@161.45,6.05 161.5,6 162.4,6 164.295,4.105 170.245,4.105 170.285,4.065 170.285,4.045 170.848,3.482 175,3.482 175,2.893 175.75,2.143 v2(175.75,1.7) ; R268.1@174.835,12.26 174.835,12.305 175.145,12.615 175.19,12.615 176.575,14 R267.2@179.45,14 ; R268.1@174.945,12.365 174.945,10.275 ; 175,3.497 175.3,3.797 v2(175.3,8.225) 174.945,8.58 174.945,10.275 ; IC39.8@177.281,8.805 C155.2@177.281,10.186 175.034,10.186 174.945,10.275
  BottomLayer w0.25: R260.1@173.25,1.45 174.7,1.45 R197.1@174.775,1.525 ; v2(175.3,8.225) 176.075,8.225 177.2,9.35 R282.1@178.5,9.35 178.5,9.3 178.825,8.975 179.001,8.975 179.547,8.429 IC38.4@179.547,7.476 ; R282.1@178.5,9.4 178.825,9.725 178.875,9.725 179.25,10.1 R262.1@179.25,10.85
  BottomLayer w0.5: R197.1@174.775,1.525 174.95,1.7 v2(175.75,1.7) 176.44,1.7 C167.2@176.475,1.665 ; C167.2@176.5,1.675 IC38.14@177.598,1.675
P5V0: C94.2 C202.2 C286.2 IC13.10 IC35.5 R73.2 | length 16.8
  TopLayer w0.5: v1(127.656,73.875) 132.125,73.875 132.475,73.525 134.325,73.525 135.1,74.3 C202.2@135.1,74.902 C286.2@135.1,76.152 ; C286.2@135.25,76.152 C286.2@135.1,76.152 ; IC35.5@135.7,77.852 135.7,77.602 135.65,77.552 135.4,77.552 135.1,77.252 C286.2@135.1,76.152
  BottomLayer w0.254: IC13.10@126.2,72.094 126.625,72.094 126.819,72.288 127.427,72.288 127.475,72.337 C94.2@127.475,72.921 ; R73.2@126.52,73.644 R73.2@126.625,73.539 ; R73.2@126.625,73.38 R73.2@126.625,73.539 ; 127.178,72.969 126.775,72.969 126.625,73.119 R73.2@126.625,73.539 ; 127.178,72.986 C94.2@127.388,72.986 ; C94.2@127.656,72.763 C94.2@127.775,72.644
  BottomLayer w0.35: C94.2@127.656,72.763 v1(127.656,73.875)
P12V0: C40.2 C72.2 C204.1 C205.1 C262.2 C263.2 D10.1 FL1.2 J5.c35 J5.c37 J6.A1 J6.D1 J6.E1 J6.G1 J6.H1 J6.J1 J6.K1 J8.28 J8.29 J9.28 J9.29 L13.1 L29.1 R27.2 R165.2 R166.2 R224.2 R236.2 R237.2 R238.2 R249.2 R250.2 R263.1 T1.3 TP2.1 | length 138.6
  TopLayer w0.3: J5.c37@65.688,32.669 66.169,32.188 66.235,32.188 v2(66.273,32.15) ; J5.c35@65.688,35.209 66.109,34.788 66.235,34.788 v2(66.273,34.75)
  TopLayer w0.5: R27.2@129.188,82.95 129.188,82.97 130.268,84.05 130.648,84.05 130.698,84.1 130.698,84.3 130.723,84.325 132.475,84.325 C72.2@132.5,84.35 132.675,84.35 133.575,85.25 v2(133.75,85.25) ; C72.2@132.675,84.2 C72.2@132.7,84.225 ; L29.1@134.275,84.1 134.525,84.35 134.525,85.1 v2(134.65,85.225) ; 137.688,6.35 138.005,6.35 138.055,6.3 138.298,6.3 139.248,5.35 L13.1@139.748,5.35 ; 137.83,6.968 138.176,6.622 ; 138.998,6.95 138.998,6.1 L13.1@139.748,5.35 ; L13.1@140.248,5.35 L13.1@139.798,5.35 ; 140.748,6.95 140.748,6.3 L13.1@139.798,5.35 ; v2(143.9,-0.55) TP2.1@145.275,-0.55 ; R263.1@166.22,6 166.252,6.032 C40.2@167.431,6.032 ; C40.2@167.449,6 v4(169.25,6) ; C263.2@169,65.325 C262.2@169,66.95 ; 171,67 171,66.942 171.383,66.559 171.458,66.559 172.283,65.734 D10.1@172.283,65.659 ; 171.033,64.759 D10.1@171.458,64.759 ; D10.1@172.41,65.785 FL1.2@174.967,65.785 ; D10.1@173.108,66.559 173.608,67.059 ; D10.1@173.233,64.709 174.533,64.709 175.033,65.209 FL1.2@175.61,65.785 ; 174.358,67.134 174.378,67.114 FL1.2@175.778,67.114 ; FL1.2@174.967,65.853 175.617,65.853 FL1.2@175.549,65.785 ; FL1.2@175.193,65.43 FL1.2@175.549,65.785 ; FL1.2@176.033,66.209 FL1.2@175.61,65.785 ; FL1.2@176.26,65.785 FL1.2@175.61,65.785 ; L13.1@139.748,5.35 L13.1@139.798,5.35 ; FL1.2@175.549,65.785 FL1.2@175.61,65.785
  MidLayer2 w0.5: v2(60.475,11.275) 66.898,17.698 66.898,31.525 v2(66.273,32.15)
  SignalLayer1 w0.5: v2(2.9,14.775) 9.875,14.775 19.45,5.2 19.45,4.45 21.025,2.875 38.05,2.875 39.475,4.3 41.3,4.3 v2(42.95,5.95)
  BottomLayer w0.5: v2(2.9,14.775) R166.2@2.9,15.73 ; v2(42.95,5.95) 42.98,5.98 R250.2@43.675,5.98 44.575,5.98 44.775,5.78 ; R165.2@45.75,10.72 45.71,10.68 45.105,10.68 44.775,10.35 44.775,5.78 ; R249.2@59.75,5.78 59.195,5.78 58.825,6.15 ; R224.2@59.75,10.72 59.71,10.68 59.255,10.68 58.825,10.25 58.825,6.15 ; R224.2@59.77,10.72 60.325,11.275 v2(60.475,11.275) ; v2(66.273,32.15) 67.073,31.35 C204.1@68.923,31.35 ; v2@66.497,34.75 66.712,34.535 67.088,34.535 C205.1@67.148,34.475 ; 44.775,5.78 R237.2@45.75,5.78 R236.2@50.25,5.78 R238.2@55,5.78 58.455,5.78 58.825,6.15
  other v4: 169.25,5 169.25,7 137.998,7.45 138.998,7.45 139.998,7.45 140.998,7.45 141.998,7.45 169.25,8 167.5,64.75 167.5,65.75 167.5,66.75 167.5,67.75
P12V0_SMPS: C61.2 C62.2 C63.2 C68.2 C69.2 C231.1 C232.2 C233.2 C234.2 C235.2 C265.1 C266.2 C267.2 C268.2 C269.2 IC32.4 IC32.9 IC32.24 IC32.25 IC32.35 IC32.36 IC34.4 IC34.9 IC34.24 IC34.25 IC34.35 IC34.36 IC46.2 IC46.3 IC46.4 IC46.5 L13.2 | length 52.2
  TopLayer w0.3: v4(74.998,4.7) 75.133,4.7 75.383,4.95 75.848,4.95 C267.2@76.248,5.35 75.898,5.7 v4(74.998,5.7) ; C267.2@76.498,5.45 76.747,5.699 IC34.36@77.95,5.699 ; C267.2@76.498,5.7 76.773,5.7 76.823,5.75 76.823,6.023 76.999,6.199 IC34.35@77.95,6.199 ; IC34.4@84.95,7.199 86.649,7.199 C269.2@86.748,7.1 ; IC34.9@84.95,9.699 86.349,9.699 C268.2@86.748,9.3 ; v4(117.173,4.4) 117.723,4.95 118.098,4.95 C232.2@118.498,5.35 ; v4(117.173,5.45) 118.398,5.45 C232.2@118.498,5.35 ; v4(117.248,12.2) 117.383,12.2 117.633,11.95 118.098,11.95 118.498,11.55 118.898,11.95 119.222,11.95 119.597,12.325 v4@119.623,12.325 ; IC32.36@120.248,5.2 118.648,5.2 C232.2@118.498,5.35 ; IC32.35@120.248,5.7 118.848,5.7 C232.2@118.498,5.35 ; IC32.4@127.248,6.7 127.694,6.7 128.2,6.193 129.155,6.193 C235.2@129.498,5.85 129.848,6.2 v4(130.773,6.2) ; IC32.9@127.248,9.2 128.247,9.2 128.347,9.3 128.723,9.3 C234.2@129.098,9.675 ; C234.2@129.073,9.7 129.123,9.75 130.331,9.75 130.375,9.794 130.375,9.815 v4(130.385,9.825)
  TopLayer w0.5: v4(74.573,11.55) C266.2@76.248,11.55 C266.2@75.948,11.85 ; v4(75.073,12.4) 75.13,12.343 75.13,12.093 75.18,12.044 75.18,11.696 ; v4(76.773,17.9) 76.773,16.225 C265.1@76.798,16.2 76.873,16.125 v4(78.248,16.125) ; C269.2@86.748,7.1 86.923,7.1 87.223,7.4 87.223,7.575 87.441,7.793 87.441,8.143 v4(87.498,8.2) ; C268.2@86.748,9.3 86.986,9.062 87.977,9.062 88.128,8.911 v4(88.209,8.911) ; v4(116.723,16.275) 116.729,16.269 118.229,16.269 C231.1@118.298,16.2 ; v4(118.273,14.6) 118.273,16.175 C231.1@118.298,16.2 ; v4(118.323,18.025) 118.298,18 C231.1@118.298,16.2 ; v4(119.648,12.325) 119.648,13.068 119.6,13.116 119.6,14.598 118.948,15.25 118.948,15.55 C231.1@118.298,16.2 ; v4@136.946,-2 137.016,-2 137.441,-1.575 138.123,-1.575 L13.2@139.248,-0.45 ; v4(136.998,0.95) 137.055,0.893 137.272,0.893 137.701,0.464 138.334,0.464 L13.2@139.248,-0.45 ; L13.2@139.748,-0.45 L13.2@139.248,-0.45
  other v4: 136.998,-1.949 135.998,-1.55 136.998,-1.05 135.998,-0.55 136.998,-0.05 135.998,0.45 97.6,7.9 95.9,9.1 95.9,11.1 120.251,11.433
PE_CK_N: C13.2 IC2.32 | length 1.1
  TopLayer w0.085: C13.2@108.248,80.15 IC2.32@108.248,81.25
PE_CK_P: C12.2 IC2.29 | length 1.2
  TopLayer w0.085: IC2.29@106.748,81.25 106.855,81.143 106.855,80.943 106.998,80.8 C12.2@106.998,80.15
PE_CLK.CLK_N: C11.1 C13.1 R128.1 | length 53.4
  TopLayer w0.085: v1(107.648,78.85) 107.86,79.062 108.16,79.062 C11.1@108.248,79.15
  SignalLayer1 w0.11: v1(107.648,78.85) 107.648,78.862 107.905,79.119 108.869,79.119 109.275,79.525 110.915,79.525 111.495,78.945 112.164,78.276 117.014,78.276 117.54,77.75 118.315,76.975 129.448,76.975 130.74,76.975 142.302,65.413 149.202,65.413 150.283,64.332 151.316,64.332 152.564,64.332 152.745,64.15 v1(152.773,64.15)
  BottomLayer w0.085: v1(152.773,64.15) 152.778,64.15 152.972,64.344 153.231,64.344 153.281,64.294 153.281,64.243 153.448,64.075 R128.1@153.468,64.075
PE_CLK.CLK_P: C9.1 C12.1 R127.1 | length 53.5
  TopLayer w0.085: C12.1@106.998,79.25 107.136,79.388 107.386,79.388 v1(107.623,79.625)
  SignalLayer1 w0.11: v1(107.623,79.625) 107.635,79.625 107.904,79.356 108.771,79.356 109.177,79.762 111.013,79.762 112.262,78.512 117.113,78.512 117.875,77.75 118.413,77.212 129.448,77.212 130.838,77.212 142.4,65.65 149.3,65.65 150.381,64.569 151.218,64.569 152.564,64.569 152.745,64.75 v1(152.773,64.75)
  BottomLayer w0.085: v1(152.773,64.75) 152.778,64.75 152.972,64.556 153.231,64.556 153.281,64.606 153.281,64.658 153.448,64.825 R127.1@153.468,64.825
PE_CLK_ALT_N: C11.2 IC3.16 | length 9.9
  TopLayer w0.085: C11.2@108.248,78.25 107.994,77.996 107.871,77.996 107.762,77.887 107.762,76.9 107.812,76.85 108.325,76.85 112.781,81.306 113.791,81.306 113.841,81.356 113.841,81.368 113.923,81.45 IC3.16@114.098,81.45
PE_CLK_ALT_P: C9.2 IC3.17 | length 10.3
  TopLayer w0.085: C9.2@106.998,78.25 107.256,77.992 107.433,77.992 107.55,77.875 107.55,76.812 107.724,76.638 108.413,76.638 112.869,81.094 113.791,81.094 113.841,81.044 113.841,81.032 113.923,80.95 IC3.17@114.098,80.95
PE_CLK_N: J6.F4 R128.2 | length 100.1
  SignalLayer1 w0.11: v1(207.376,23.376) 207.395,23.356 207.652,23.356 215.788,15.22 215.788,6.8 215.05,6.062 208.722,6.062 208.482,5.822 208.482,5.475 207.957,4.95 J6.F4@207.9,4.95
  BottomLayer w0.085: R128.2@154.128,64.075 154.148,64.075 154.315,64.243 154.315,64.294 154.365,64.344 154.644,64.344 155.138,63.85 155.138,62.937 159.325,58.75 172.275,58.75 207.28,23.745 ; 207.28,23.745 207.372,23.653 207.372,23.379 v1(207.376,23.376)
PE_CLK_P: J6.E4 R127.2 | length 100.5
  SignalLayer1 w0.11: v1(207.8,23.8) 207.82,23.78 207.82,23.524 216.025,15.318 216.025,6.701 215.149,5.825 208.82,5.825 208.719,5.724 208.719,5.475 209.244,4.95 J6.E4@209.3,4.95
  BottomLayer w0.085: R127.2@154.128,64.825 154.148,64.825 154.315,64.658 154.315,64.606 154.365,64.556 154.732,64.556 155.35,63.938 155.35,63.025 159.413,58.962 172.363,58.962 207.367,23.957 207.522,23.803 207.797,23.803 v1(207.8,23.8)
PGOOD_FMC: IC4.P20 IC32.20 IC34.20 R213.1 R277.1 T8.1 T26.1 TP1.1 | length 201.9
  TopLayer w0.125: TP1.1@42.25,12.75 42.376,12.624 v2(43.375,12.624) 44.549,11.45 47.6,11.45 48.1,10.95 52.412,10.95 52.712,11.25 56.9,11.25 57.65,12 61.248,12 67.248,18 75.323,18 75.948,18.625 77.523,18.625 77.848,18.3 79.691,18.3 79.991,18 80.623,18 80.873,17.75 80.873,15.075 79.973,14.175 v2(79.973,13.475) 80.023,13.475 80.123,13.375 80.123,13.25 80.498,12.875 80.498,12.807 80.7,12.605 IC34.20@80.7,11.949 ; IC4.P20@108.998,51.95 v1(109.498,51.45) ; IC32.20@122.998,11.45 122.998,12.228 v2(123.034,12.264)
  TopLayer w0.3: v1(161.1,5.1) R277.1@161.1,4.125 161.25,3.975 T26.1@162.625,3.975
  MidLayer2 w0.125: v1@109.473,51.45 v1(109.498,51.45) 110.948,51.45 111.398,51 112.898,51 114.473,49.425 114.473,48.5 113.898,47.925 113.898,44.05 114.722,43.226 123.497,43.226 123.773,42.95 123.773,39.975 121.748,37.95 121.748,30.923 120.775,29.95 119.775,29.95 116.223,26.398 116.223,23.974 114.398,22.149 v2(114.398,22.1)
  MidLayer2 w0.15: v2(123.034,12.264) 123.673,11.625 126.5,11.625 127.7,10.425 131.45,10.425 133.35,8.525 142.725,8.525 144.901,6.349 146.599,6.349 146.925,6.675 154.95,6.675 155.55,7.275 159.6,7.275 161.1,5.775 v1(161.1,5.1)
  SignalLayer1 w0.125: v2(79.973,13.475) 80.773,13.475 81.998,14.7 81.998,15.598 91.35,24.95 92.748,24.95 96.848,20.85 112.225,20.85 113.475,22.1 v2(114.398,22.1) 115.034,21.464 115.034,19.566 121.175,13.425 121.873,13.425 v2(123.034,12.264)
  BottomLayer w0.125: v2(43.375,12.624) 43.351,12.624 42.5,13.475 T8.1@42.5,13.675 42.5,13.875 42.737,14.112 42.937,14.112 43.503,14.678 43.578,14.678 43.805,14.905 R213.1@43.805,14.925
PROG_TCK: D3.3 IC16.2 J2.6 R86.1 | length 27.1
  TopLayer w0.125: v1(146.823,63.175) 147.598,62.4 148.725,62.4 153.125,58 153.125,55.6 151.1,53.575 150.298,53.575 148.623,51.9 IC16.2@148.623,51 ; v1(147.256,66.04) 147.258,66.038 D3.3@147.258,64.95 D3.3@147.407,64.95 ; J2.6@148.748,67.825 148.644,67.721 148.644,66.288 147.511,65.155 147.511,65.038 147.423,64.95 D3.3@147.407,64.95 ; R86.1@149.028,64.95 D3.3@147.407,64.95
  BottomLayer w0.125: v1(146.823,63.175) 147.256,63.608 v1(147.256,66.04)
PROG_TDI: D3.5 IC16.14 J2.10 R87.1 | length 16.3
  TopLayer w0.125: J2.10@144.748,67.825 144.75,67.823 v1(144.75,66.025) ; v1(144.75,64.674) 144.776,64.7 145.309,64.7 145.36,64.649 145.374,64.649 D3.5@145.573,64.45 ; D3.5@145.738,64.45 D3.5@145.573,64.45 ; IC16.14@149.273,56.9 149.273,59.599 147.597,61.275 146.375,61.275 144.043,63.607 R87.1@144.043,64.4 144.168,64.275 145.412,64.275 145.486,64.348 145.486,64.363 D3.5@145.573,64.45
  BottomLayer w0.125: v1(144.75,64.674) v1(144.75,66.025)
PROG_TDO: D3.6 IC16.11 J2.8 | length 14.4
  TopLayer w0.1: v1(145.725,63.4) 147.211,61.914 147.486,61.914 151.209,58.191 151.209,56.914 IC16.11@151.223,56.9
  TopLayer w0.125: v1(145.725,63.4) 145.738,63.413 D3.6@145.738,63.95 ; v1@146.473,66.05 146.473,67.55 J2.8@146.748,67.825
  BottomLayer w0.125: v1(145.725,63.4) 145.75,63.4 146.475,64.125 v1(146.475,66.05)
PROG_TMS: D3.1 IC16.5 J2.4 R85.1 | length 26.2
  TopLayer w0.125: IC16.5@150.573,51 150.573,52.048 153.825,55.3 153.825,58.825 150.943,61.707 150.943,64.03 150.055,64.03 149.375,63.35 147.473,63.35 147.4,63.423 147.4,63.95 149.028,63.95 149.473,64.395 149.473,65.725 150.261,66.513 150.311,66.513 150.748,66.95 J2.4@150.748,67.825
PROG_TRST: D3.4 IC19.3 R92.1 R93.1 R94.2 | length 16.8
  TopLayer w0.125: IC19.3@135.775,59.1 135.912,59.237 135.912,59.414 139.498,63 R92.1@139.498,63.73 R94.2@140.498,63.73 140.672,63.904 140.922,63.904 141.943,64.925 143.375,64.925 143.475,65.025 145.663,65.025 D3.4@145.738,64.95 145.825,65.037 145.825,65.377 145.752,65.45 R93.1@142.468,65.45
PROGRAM_B: IC4.N12 R82.1 T5.3 | length 54.4
  TopLayer w0.125: v1(100.198,37.875) 102.698,40.375 103.352,40.375 103.932,40.955 103.932,41.284 103.932,41.343 104.167,41.578 104.42,41.578 104.423,41.575 105.648,41.575 110.648,36.575 111.525,36.575 112.2,35.9 112.2,33.775 111.85,33.425 111.85,32.125 112.5,31.475 116.275,31.475 116.625,31.125 125.073,31.125 126.15,32.202 126.15,32.355 v2(126.221,32.427) ; IC4.N12@100.998,52.95 v1(101.498,52.45)
  MidLayer2 w0.125: v1(100.198,37.875) 100.651,37.875 101.248,38.472 101.248,39.2 100.848,39.6 100.848,51.8 v1(101.498,52.45)
  BottomLayer w0.125: R82.1@124.718,30.95 124.872,31.104 125.122,31.104 125.5,31.482 125.88,31.482 126.248,31.85 126.221,31.877 v2(126.221,32.427)
PSU_EN: IC46.12 R187.1 R188.2 R264.2 | length 82.5
  TopLayer w0.125: IC46.12@101.125,9.2 v1(102.8,9.2)
  MidLayer2 w0.125: v1@102.722,9.072 102.722,7.378 v2(104.025,6.075) ; v1(102.8,9.2) 103.975,9.2 105.311,10.536 105.311,10.686 105.539,10.914 105.689,10.914 106.025,11.25 118.65,11.25 119.2,10.7 121,10.7 121.55,11.25 122.568,11.25 122.575,11.243 126.207,11.243 129.314,8.137 142.314,8.137 143.15,7.3 143.15,6.2 144.275,5.075 154.35,5.075 v2(155.95,6.675)
  BottomLayer w0.125: R187.1@103.028,6.95 103.248,6.73 R188.2@103.248,5.92 103.403,6.075 v2(104.025,6.075) ; v2(155.95,6.675) 158.075,6.675 163.098,1.652 R264.2@170.769,1.652
RST: IC39.3 T15.1 | length 2.3
  TopLayer w0.114: v2(170.65,6.35) 171.763,6.35 IC39.3@171.798,6.315
  BottomLayer w0.114: v2(170.65,6.35) 170.65,5.332 T15.1@170.756,5.226
RSTn: D12.1 R269.2 R276.1 T25.1 | length 45.4
  TopLayer w0.15: v2(168.325,3.3) 168.325,2.825 173.025,-1.875 182.8,-1.875 183.875,-0.8 183.875,1.934 185.556,3.615 185.59,3.615 185.791,3.816 R276.1@185.791,3.85 ; v2@168.442,8.317 168.442,8.412 168.477,8.446 D12.1@168.477,9.302
  TopLayer w0.25: D12.1@168.45,9.56 168.45,12.95 173.024,17.524 T25.1@178.741,17.524
  BottomLayer w0.15: v2(168.325,3.3) 168.364,3.339 168.364,8.239 v2(168.375,8.25)
SC_MISO: IC20.4 IC24.10 | length 7.7
  TopLayer w0.125: v2(122.9,37.825) 122.896,37.825 122.55,38.171 122.55,41.625 123.064,42.139 v2(123.165,42.139)
  BottomLayer w0.125: v2(122.9,37.825) 122.911,37.825 123.161,38.075 IC24.10@124.436,38.075 ; v2(123.165,42.139) 124.337,42.139 IC20.4@124.398,42.2
SC_MOSI: IC20.1 IC24.14 | length 15.9
  BottomLayer w0.125: IC20.1@124.398,44.15 125.375,44.15 125.65,43.875 125.65,41.198 126.323,40.525 127.55,40.525 128.525,39.55 128.525,38.35 128.975,37.9 128.975,36.525 128.1,35.65 127.525,35.65 127.225,35.35 124.561,35.35 IC24.14@124.436,35.475
SC_SCLK: IC20.8 IC24.11 | length 7.1
  BottomLayer w0.25: IC20.8@118.598,40.25 119.098,40.25 119.198,40.15 119.198,40.127 121.964,37.361 124.372,37.361 IC24.11@124.436,37.425
SC_SSEL: IC20.11 IC24.9 R113.1 T4.1 | length 20.5
  TopLayer w0.125: v2(120,41.525) v2(121.325,40.2) 121.65,39.875 121.65,38.225 123.15,36.725 123.15,36.077 v2(121.098,34.025)
  BottomLayer w0.125: R113.1@117.083,32.45 118.398,32.45 118.56,32.612 118.962,32.612 120.375,34.025 v2(121.098,34.025) ; IC20.11@118.598,42.2 118.71,42.088 119.437,42.088 v2(120,41.525) ; v2(121.325,40.2) 121.325,38.8 121.4,38.725 IC24.9@124.436,38.725
SERVMOD_2V5: IC4.P14 IC17.10 IC21.5 IC21.6 IC21.12 IC21.13 R105.2 R271.2 R273.2 | length 56.5
  TopLayer w0.125: IC4.P14@102.998,51.95 v1(103.498,51.45) ; R271.2@105.753,28.8 105.753,28.82 105.981,29.047 106.001,29.047 106.528,29.575 v2(106.573,29.575) ; v2(115.825,33.325) 115.859,33.291 116.284,33.291 116.48,33.095 R273.2@117,33.095 R273.2@117.07,33.025 ; IC21.5@118.174,33.055 117.05,33.055 117.07,33.055 117.297,32.828 117.297,32.808 117.705,32.4 IC21.6@118.598,32.4 ; IC21.5@118.598,33.05 118.607,33.041 119.671,33.041 119.687,33.025 120.8,33.025 122.401,34.626 122.724,34.626 ; IC21.12@124.398,34.35 123,34.35 122.724,34.626 ; IC21.13@124.398,35 123.098,35 122.724,34.626
  MidLayer2 w0.1: v1(103.498,51.45) 103.533,51.415 103.533,51.19 103.998,50.725 103.998,50.2 104.298,49.9 105.509,49.9 105.824,49.585 105.824,49.315 105.823,49.314 105.823,48.586 105.824,48.585 105.824,42.576 106.748,41.652 106.748,29.834 v2@106.573,29.659
  MidLayer2 w0.125: v2(106.573,29.575) 106.573,29.1 107.048,28.625 107.573,28.625 109.423,26.775 110.723,26.775 111.998,28.05 111.998,30.073 115.2,33.275 115.775,33.275 v2(115.825,33.325)
  BottomLayer w0.125: v2(106.573,29.575) 106.595,29.553 106.595,29.228 107.098,28.725 IC17.10@108.348,28.725 ; R105.2@115.795,34.425 115.825,34.395 v2(115.825,33.325)
SERVMOD_3V3: IC9.21 IC16.1 IC19.6 IC27.9 IC28.9 IC29.9 IC30.16 IC40.5 IC40.6 IC40.12 IC40.13 R41.1 R129.2 R272.1 R274.2 | length 182.2
  TopLayer w0.1: IC19.6@133.398,57.8 134.039,57.8 134.239,57.6 v2(134.298,57.6) ; v2(147.225,52.725) 147.225,51.173 147.398,51 IC16.1@147.973,51
  TopLayer w0.125: IC9.21@114.148,28.075 115.416,28.075 117.791,30.45 119.625,30.45 120.347,29.728 120.347,28.303 120.875,27.775 121.85,27.775 122.748,28.673 122.748,30.55 123.048,30.85 128.825,30.85 129.4,31.425 133.1,31.425 138.163,36.488 146.012,36.488 v2(146.05,36.45) ; v2(157.7,11.275) 157.275,10.85 157.275,5.065 157.67,4.67 R129.2@157.67,4.65 157.725,4.595 157.725,2.825 160.32,0.23 R274.2@166.175,0.23 166.195,0.23 166.422,0.003 166.422,-0.017 167.968,-1.563 168.213,-1.563 v2(168.275,-1.625) ; R41.1@185.93,6.825 185.975,6.78 v2(185.975,6.05)
  BottomLayer w0.1: v2(134.298,57.6) 134.298,59.6 136.773,62.075 140.348,62.075 140.773,61.65 140.773,60.385 ; 140.773,60.375 142.268,58.88 147.225,53.923 v2(147.225,52.725) 147.748,52.725 149.723,50.75 152.198,50.75 153.023,49.925 153.023,49.5 152.687,49.164 152.687,45.336 152.767,45.256 153.092,45.256 IC27.9@153.148,45.2 153.148,42.839 152.687,42.378 152.687,39.04 152.79,38.936 152.839,38.936 152.898,38.878 152.898,38.775 152.973,38.7 IC28.9@153.062,38.7 ; IC30.16@141.273,58.45 141.838,58.45 142.261,58.873 ; v2(146.05,36.45) 146.798,36.45 147.623,37.275 152.887,37.275 152.987,37.175 ; 150,23.5 151.946,25.446 IC40.6@154.054,25.446 IC40.5@154.054,26.096 ; IC29.9@153.148,32.2 153.073,32.275 152.873,32.275 152.687,32.461 152.687,35.558 152.673,35.571 152.673,35.846 152.723,35.896 152.723,36.05 152.987,36.314 152.987,37.175 ; IC28.9@153.148,38.7 IC28.9@153.062,38.7 ; 152.987,37.175 152.987,38.625 IC28.9@153.062,38.7
  BottomLayer w0.125: R272.1@116.968,28.7 117.08,28.812 v2(117.08,29.737) ; IC29.9@153.148,32.2 153.148,30.61 152.077,29.538 150.549,29.538 149.094,28.083 148.291,28.083 IC40.13@148.254,28.046 IC40.12@148.254,27.396 148.247,27.404 147.302,27.404 147,27.101 147,24 147.139,23.861 147.733,23.861 148.094,23.5 150,23.5 151.15,22.35 151.15,20.125 153.725,17.55 153.725,16.275 157.7,12.3 v2(157.7,11.275) ; v2(168.275,-1.625) 182.75,-1.625 184.338,-0.037 184.338,4.413 v2(185.975,6.05)
SFP.LED: IC44.27 IC45.10 T23.1 | length 33.7
  TopLayer w0.127: v1(22.825,23.225) IC45.10@24.025,23.225 IC44.27@26.852,23.225
  BottomLayer w0.127: T23.1@0.225,14.975 0.45,14.975 0.687,14.739 0.687,14.727 2.241,13.173 9.623,13.173 16.075,19.625 16.075,22.725 16.575,23.225 19.375,23.225 19.8,22.8 22.4,22.8 v1(22.825,23.225)
SFP.LOS: IC44.26 IC45.9 J3.8 R180.1 | length 31.5
  TopLayer w0.127: v1(18.475,23.675) 18.475,23.601 18.575,23.501 18.575,13.775 23.525,8.825 26.875,8.825 27.375,9.325 J3.8@28.9,9.325 ; v1(20.425,23.675) 20.793,23.307 20.949,23.307 R180.1@21.175,23.08 ; R180.1@21.155,23.08 22.016,23.08 22.811,23.875 IC45.9@24.025,23.875 IC44.26@26.853,23.875
  BottomLayer w0.127: v1(18.475,23.675) v1(20.425,23.675)
SFP.MOD_PRESENT: IC44.25 IC45.8 J3.6 R278.1 | length 27.6
  TopLayer w0.127: IC44.25@26.853,24.525 23.125,24.525 22.705,24.945 R278.1@22.125,24.945 21.045,24.945 19.975,23.875 19.975,22.575 23.6,18.95 23.6,10.875 23.95,10.525 25.3,10.525 25.7,10.925 J3.6@28.9,10.925
SFP.RATE_SELECT: IC44.24 IC45.7 J3.7 R285.2 | length 31.8
  TopLayer w0.127: IC44.24@26.853,25.175 IC45.7@24.025,25.175 22.975,25.175 22.65,25.5 21.45,25.5 21.195,25.245 R285.2@19.525,25.245 19.07,25.245 18.8,24.975 18.8,24.1 19.175,23.725 19.175,13.875 23.5,9.55 25.225,9.55 26.225,10.55 27.15,10.55 27.575,10.125 J3.7@28.9,10.125
SFP.RATE_SELECT1: IC44.23 IC45.6 J3.9 R286.2 | length 33.6
  TopLayer w0.127: IC44.23@26.853,25.825 IC45.6@24.025,25.825 23.995,25.855 18.83,25.855 18.05,25.075 18.05,13.6 23.125,8.525 J3.9@28.9,8.525
SFP.TX_DISABLE: IC44.22 IC45.5 J3.3 | length 20.7
  TopLayer w0.127: IC45.5@24.025,26.475 IC44.22@26.853,26.475 28.175,26.475 28.425,26.225 28.425,21.9 26.25,19.725 26.25,13.826 26.751,13.325 J3.3@28.9,13.325
SFP.TX_FAULT: IC44.21 IC45.4 J3.2 R179.1 | length 22.6
  TopLayer w0.127: R179.1@21.975,27.13 21.98,27.125 IC45.4@24.025,27.125 IC44.21@26.853,27.125 28.375,27.125 28.875,26.625 28.875,21.65 26.7,19.475 26.7,14.349 26.974,14.075 28.85,14.075 J3.2@28.9,14.125